# Altium PCB A313_4.PcbDoc (part 3 of 3)
Units mm, origin at the board's own origin, x right, y up, seen from the top; angles counter-clockwise.
Board outline 230 x 157 mm, 2 copper layers (Top Layer, Bottom Layer); 244 components, 187 nets, 1242 pads, 1093 vias.
Unrouted connection lines stored in the file: 1.
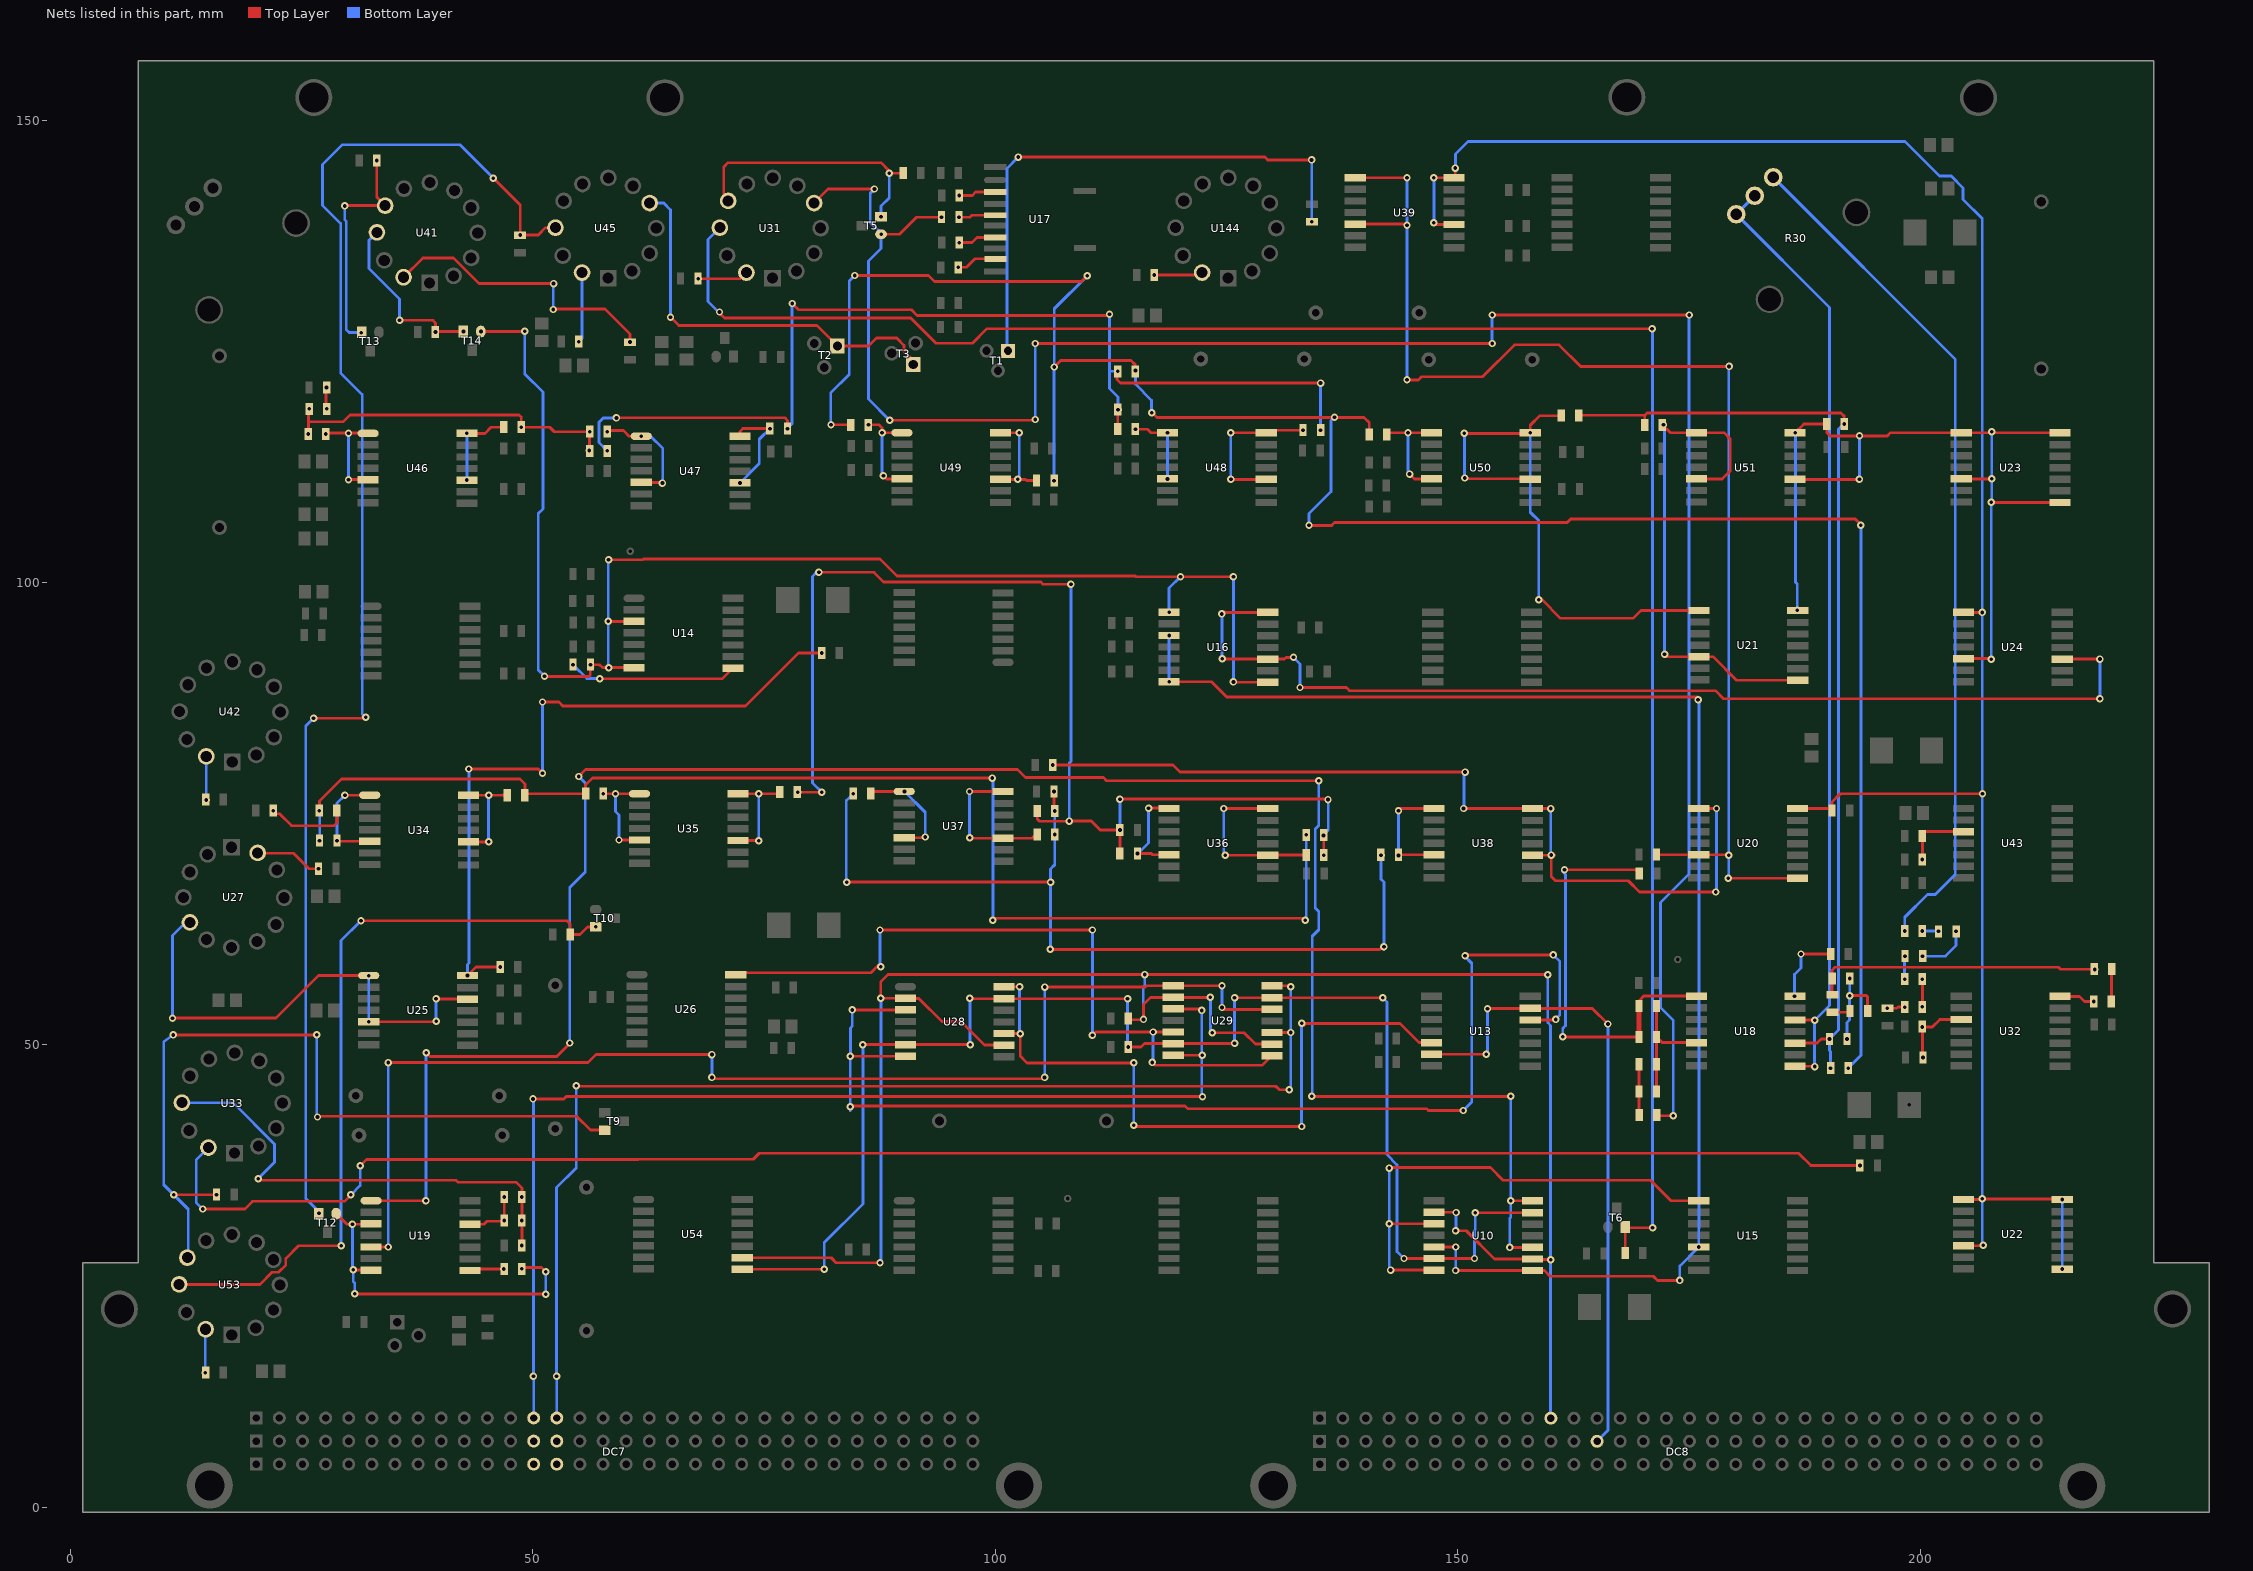
[diagram p3: the nets of this part, all layers, seen from the top]

## Via types
v1: diameter 0.8, hole 0.4, Top Layer to Bottom Layer, 1092 vias
v2: diameter 0.8, hole 0.4, Top Layer to Bottom Layer, tented top, 1 vias

## Nets (pads, with @x,y where several pads share a name; then routed paths per layer and width w, separated by ;. In a path a pad name is that pad's centre, name@x,y a point inside that pad or via, vN(x,y) a via of type N, cw(c..) or ccw(c..) an arc to the next point about the centre after c; other vN are vias at no path point) (continued)
NetR19_1: R19.1 T14.1 U14.3 U14.7 U16.1 U16.8 | length 156.6
  Top Layer w0.3: T14.1@44.357,127.142 v1@48.842,127.142 ; v1@51.25,89.825 56.05,89.825 56.199,89.974 56.199,90.508 R19.1@56.485,90.794 ; v1(56.224,91.107) 57.193,91.107 57.506,90.794 v1(58.2,90.794) U14.7@60.944,90.794 ; v1@58.125,95.775 v1(58.144,95.794) U14.3@60.944,95.794 ; v1(58.175,102.45) 61.85,102.45 61.95,102.55 87.525,102.55 89.375,100.7 115.15,100.7 115.225,100.625 v1(120.025,100.625) ; v1@120.025,100.7 120.1,100.7 120.175,100.625 v1(125.75,100.625) ; v1(125.75,89.25) 125.68,89.22 U16.8@129.467,89.22
  Bottom Layer w0.3: v1(49.1,127.175) 49.1,122.575 51.085,120.59 51.085,107.96 50.575,107.45 50.575,90.55 v1(51.25,89.875) ; v1(58.175,102.45) 58.144,102.419 v1(58.144,95.794) 58.144,90.85 v1(58.2,90.794) ; v2(118.793,96.77) 118.793,99.393 v1(120.025,100.625) ; v1(125.75,89.25) v1(125.75,100.625) v1@125.75,100.725
  other v1: 44.375,127.142
NetR19_2: R19.2 U14.8 | length 18.4
  Top Layer w0.3: v1@57.194,89.581 70.456,89.581 U14.8@71.619,90.744
  Bottom Layer w0.3: v1(54.324,91.107) 55.825,89.606 v1(57.219,89.606)
NetR21_1: R21.1 U17.8 | length 4.8
  Top Layer w0.3: R21.1@95.991,133.934 R21.1@96.139,134.082 ; v1(95.999,134.082) R21.1@96.139,134.082 ; U17.8@100.019,135.003 U17.8@99.936,135.003 ; U17.8@100.083,134.856 U17.8@99.936,135.003 ; R21.1@96.139,134.082 96.854,134.082 97.775,135.003 U17.8@99.936,135.003
NetR22_1: R22.1 U17.6 | length 4.2
  Top Layer w0.3: v1(96.099,136.757) 97.457,136.757 98.017,137.317 U17.6@99.991,137.317 ; U17.6@99.991,137.17 U17.6@100.055,137.17
NetR23_1: R23.1 U17.4 | length 4.7
  Top Layer w0.3: R23.1@95.991,139.014 95.991,139.241 R23.1@96.165,139.415 ; v1(96.074,139.507) 97.257,139.507 97.467,139.717 U17.4@99.908,139.717 ; U17.4@99.991,139.717 U17.4@99.908,139.717 ; U17.4@100.055,139.57 U17.4@99.908,139.717
NetR24_1: R24.1 U17.2 | length 4.5
  Top Layer w0.3: R24.1@95.991,141.554 95.991,141.891 R24.1@96.028,141.928 ; v1(96.099,141.857) 97.512,141.857 97.872,142.217 U17.2@99.991,142.217 ; U17.2@99.991,142.07 U17.2@100.055,142.07
NetR27_2: R27.2 U144.12 | length 5.1
  Top Layer w0.3: R27.2@117.326,133.243 122.083,133.243 U144.12@122.359,133.519
  other v1: 117.201,133.256
NetR28_1: R28.1 T1.1 | length 60.8
  Top Layer w0.3: v1(102.481,146.006) 129.15,146.006 129.456,145.7 v1(134.2,145.7)
  Bottom Layer w0.3: T1.1@101.255,124.657 101.255,144.78 v1(102.481,146.006) v1@102.675,146.2 ; v1@134.225,145.825 134.2,145.8 v1(134.2,145.7) 134.23,145.67 v1(134.23,139.007)
NetR30_1: R30.1 R293.2 | length 92.4
  Bottom Layer w0.3: R30.1@184.125,143.825 203.8,124.15 203.8,68.4 201.65,66.25 200.8,66.25 198.349,63.799 v1(198.349,62.307)
NetR30_2: R30.2 R30.3 U18.8 U18.12 | length 104.1
  Top Layer w0.3: U18.8@186.49,47.691 v1@188.334,47.691 ; U18.12@186.49,52.691 v1@188.559,52.691
  Bottom Layer w0.3: R30.2@182.125,141.825 R30.3@180.125,139.825 190.225,129.725 190.225,54.275 v1(188.6,52.65) v1(188.6,47.65) 188.6,47.425 v1@188.55,47.375
NetR32_1: R32.1 R33.1 U19.12 | length 6.1
  Top Layer w0.3: U19.12@43.171,30.593 44.7,30.593 45.032,30.925 46.815,30.925 v1(46.901,31.011) ; R33.1@46.901,31.399 v1(46.901,33.551)
NetR32_2: R32.2 R33.2 R35.1 U33.10 | length 51.6
  Top Layer w0.3: v1@20.25,35.565 20.465,35.35 41.682,35.35 41.881,35.15 48.175,35.15 48.801,34.524 v1(48.801,33.551) v1(48.801,31.011) 48.801,28.461 R35.1@48.625,28.285
  Bottom Layer w0.3: U33.10@12.035,43.746 17.554,43.746 22.05,39.25 22.05,37.3 v1(20.275,35.525)
  other v1: 48.774,28.307
NetR34_1: R34.1 T12.1 U19.3 U19.7 | length 39.7
  Top Layer w0.3: T12.1@28.716,31.744 29.867,30.593 v1(30.475,30.593) 32.183,30.593 32.364,30.775 U19.3@32.496,30.643 ; v1@30.557,25.643 U19.7@32.496,25.643 ; v1@30.756,23.044 v1(51.375,23.044) ; R34.1@48.774,25.907 50.918,25.907 v1@51.375,25.45
  Bottom Layer w0.3: v1(30.475,30.593) 30.475,26.031 v1@30.7,25.806 ; v1(30.557,25.662) 30.557,24.4 30.725,24.232 v1(30.725,23.094) ; v1(51.375,23.044) v1(51.375,25.469)
  other v1: 48.774,25.782
NetR34_2: R34.2 U19.8 | length 3.4
  Top Layer w0.3: U19.8@43.46,25.757 v1(46.849,25.757)
NetR36_1: R36.1 U18.14 | length 8.2
  Top Layer w0.3: v1(186.425,55.241) U18.14@186.49,55.241 ; v1(187.125,59.825) R36.1@190.357,59.825
  Bottom Layer w0.3: v1(186.425,55.241) 186.425,57.625 187.125,58.325 v1(187.125,59.825)
NetR39_1: R39.1 R40.2 U25.14 | length 75
  Top Layer w0.3: v1(42.917,57.495) 43.85,58.428 v1(46.466,58.428) ; v1(43.069,79.831) 50.569,79.831 v1(51.025,79.375) ; v1@50.988,79.337 v1@51.013,79.312 ; v1(51.025,87.075) 52.8,87.075 53.225,86.65 72.975,86.65 78.707,92.382 v1(81.229,92.382)
  Bottom Layer w0.3: v1(42.917,57.495) 42.917,58.7 43.069,58.852 v1(43.069,79.831) ; v1(51.025,79.375) v1(51.025,87.075)
NetR42_1: R42.1 U27.12 | length 7.5
  Top Layer w0.3: U27.12@20.245,71.255 20.775,70.725 24.1,70.725 25.782,69.043 v1(26.801,69.043)
NetR47_1: R47.1 T6.3 U31.10 | length 216.3
  Top Layer w0.3: v1(70.175,129.25) 70.175,129.125 70.25,129.05 70.7,128.6 90.85,128.6 93.575,125.875 97.525,125.875 99.1,127.45 v1(171.025,127.45) ; R47.1@168.126,27.418 168.13,27.422 T6.3@168.13,30.025 ; T6.3@168.13,30.295 T6.3@168.2,30.225 ; T6.3@168.4,30.025 T6.3@168.2,30.225 ; v1(171.075,30.225) T6.3@168.2,30.225
  Bottom Layer w0.3: v1(70.175,129.25) 70.05,129.25 68.925,130.375 68.925,137.082 U31.10@70.213,138.37 ; v1(171.025,127.45) 171.075,127.4 v1(171.075,30.225)
NetR48_1: R48.1 T5.3 U31.9 | length 29.2
  Top Layer w0.3: U31.9@71.102,141.266 70.625,141.743 70.625,144.95 71.075,145.4 87.625,145.4 88.525,144.5 v1(88.525,144.25) R48.1@89.997,144.25
  Top Layer w0.7: R48.1@89.997,144.25 R48.1@90.027,144.28
  Bottom Layer w0.3: v1(87.644,139.539) 87.644,140.702 88.525,141.583 v1(88.525,144.25)
NetR49_2: R49.2 U31.12 | length 5.5
  Top Layer w0.3: v1(67.875,132.843) 72.407,132.843 U31.12@73.083,133.519
NetR50_1: R50.1 R52.1 U32.3 | length 7.4
  Top Layer w0.3: R52.1@200.253,49.098 v1(200.253,51.925) 201.325,51.925 202.141,52.741 U32.3@204.454,52.741
  other v1: 200.324,48.633
NetR51_2: R51.2 U33.12 | length 191.3
  Top Layer w0.3: v1(14.275,32.25) 18.85,32.25 19.675,33.075 29.6,33.075 v1(30.3,33.775) ; v1@31.15,36.75 v1(31.313,36.913) 32.01,37.61 61.375,37.61 61.39,37.625 73.825,37.625 74.475,38.275 186.875,38.275 188.193,36.957 v1(193.499,36.957) ; R51.2@193.499,36.782 R51.2@193.599,36.782
  Bottom Layer w0.3: v1(14.275,32.25) 13.575,32.95 13.575,37.565 U33.12@14.905,38.895 ; v1(30.3,33.775) 31.313,34.788 v1(31.313,36.913)
NetR53_2: R53.2 R54.1 | length 9
  Top Layer w0.3: R53.2@21.801,74.993 22.607,74.993 23.9,73.7 28.5,73.7 28.799,73.999 R54.1@28.799,75.332
  other v1: 21.901,75.318
NetR54_2: R54.2 R55.2 R56.2 R57.2 R58.1 | length 139.6
  Top Layer w0.3: R54.2@26.908,75.641 26.908,76.358 29.3,78.75 48.6,78.75 49.128,78.222 49.128,76.843 49.45,77.165 R57.2@55.688,77.165 55.688,78.113 56.425,78.85 99.425,78.85 v1@99.625,78.65 ; v1(99.725,63.475) 99.725,63.675 99.75,63.7 v1@133.525,63.7
  Bottom Layer w0.3: v1@26.933,72.06 26.933,75.332 v1@26.933,75.4 ; v1(99.725,63.475) 99.75,63.5 v1@99.75,78.925 ; v1(133.525,63.475) 133.575,63.475 133.626,63.526 v1(133.626,72.718)
  other v1: 26.908,72.085 26.899,75.332 99.675,78.85
NetR55_1: R55.1 U34.1 U34.5 | length 12
  Top Layer w0.3: v1(28.808,72.085) 28.871,72.022 U34.5@32.496,72.022 ; v1@29.665,77.21 v1(29.665,76.993) 29.673,77.001 U34.1@32.35,77.001
  Bottom Layer w0.3: v1(28.808,72.085) 28.808,76.136 v1(29.665,76.993) ; v1@29.567,77.091 v1@29.676,77.199
NetR56_1: R56.1 U34.10 U34.14 | length 11.6
  Top Layer w0.3: U34.10@43.025,71.951 45.2,71.951 v1(45.201,71.95) ; U34.14@43.025,77.001 v1(45.201,77.001) 46.77,77.001 46.794,77.025 46.944,76.875 47.07,77.001 R56.1@47.228,76.843
  Bottom Layer w0.3: v1@45.201,71.981 v1(45.201,77.001)
NetR57_1: R57.1 U35.1 U35.5 | length 11.3
  Top Layer w0.3: v1(57.588,77.165) v1(58.925,77.165) U35.1@61.499,77.165 ; v1(59.299,72.149) U35.5@61.516,72.149
  Bottom Layer w0.3: v1(58.925,77.165) 58.925,75.225 59.299,74.851 v1(59.299,72.149)
NetR58_2: R58.2 R59.2 R60.2 R61.2 R62.2 R63.1 | length 125.6
  Top Layer w0.3: R59.2@78.592,77.351 v1(78.618,77.325) v1(81.225,77.325) ; v1(80.925,101.1) 86.875,101.1 87.925,100.05 104.925,100.05 105.175,99.8 v1(108.175,99.8) ; R63.1@104.527,75.285 104.527,74.448 104.79,74.185 v1@108,74.185 ; v1(108,74.2) 110.375,74.2 111.347,73.228 v1(113.473,73.228) R60.2@113.473,70.688 ; v1(113.473,76.575) v1@135.975,76.575 ; v1(135.526,70.518) R58.2@135.526,72.718
  Bottom Layer w0.3: v1@80.625,101.05 80.225,100.65 80.225,78.325 v1(81.225,77.325) ; v1(108,74.2) 108,80.475 108.175,80.65 v1(108.175,99.8) ; v1(113.473,73.228) v1(113.473,76.575) v1@113.473,76.777 ; v1(135.5,72.65) 135.5,72.728 136,73.228 v1@136,76.5
  other v1: 135.975,76.525
NetR59_1: R59.1 U35.10 U35.14 | length 11.3
  Top Layer w0.3: U35.10@72.19,72.099 v1@74.174,72.099 ; U35.14@72.19,77.149 v1(74.425,77.149) R59.1@76.49,77.149
  Bottom Layer w0.3: v1@74.425,72.1 v1(74.425,77.149)
  other v1: 74.4,72.075
NetR60_1: R60.1 U36.1 U36.5 | length 11.2
  Top Layer w0.3: v1(115.373,70.688) 116.9,70.688 117.027,70.561 U36.5@118.793,70.561 ; v1(116.575,75.6) 118.754,75.6 U36.1@118.793,75.561
  Bottom Layer w0.3: v1(115.373,70.688) 115.437,70.688 116.575,71.826 v1(116.575,75.6)
NetR61_1: R61.1 U36.10 U36.14 | length 18.4
  Top Layer w0.3: v1(124.711,75.561) U36.14@129.467,75.561 ; v1(124.85,70.511) U36.10@129.467,70.511 129.474,70.518 R61.1@133.626,70.518
  Bottom Layer w0.3: v1@124.711,70.65 v1(124.711,75.561)
NetR63_2: R63.2 R64.2 R65.2 R66.2 R67.1 | length 95.5
  Top Layer w0.3: v1(83.925,67.6) v1(105.975,67.6) ; v1@106.225,60.325 141.6,60.325 v1@142.025,60.75 ; R63.2@106.349,75.053 v1(106.349,77.407)
  Bottom Layer w0.3: v1(83.925,67.6) 83.89,67.635 83.89,76.411 v1(84.644,77.165) ; v1@105.975,60.575 v1(105.975,67.6) 105.975,69.026 106.427,69.478 v1(106.427,72.745) v1(106.427,75.285) ; v1(141.714,70.518) 141.714,67.911 142.025,67.6 v1(142.025,60.6) v1@142.025,60.325
  other v1: 105.95,60.325
NetR64_1: R64.1 U37.1 U37.5 | length 11.6
  Top Layer w0.3: R64.1@86.782,77.403 U37.1@90.154,77.403 v1(90.18,77.403) ; U37.5@90.154,72.403 92.353,72.403 v1(92.425,72.475)
  Bottom Layer w0.3: v1(90.18,77.403) 92.425,75.158 v1(92.425,72.475)
NetR65_1: R65.1 U37.10 U37.14 | length 15.8
  Top Layer w0.3: v1@97.172,72.353 U37.10@100.829,72.353 103.952,72.353 R65.1@104.251,72.652 ; v1(97.203,77.403) U37.14@100.829,77.403
  Bottom Layer w0.3: v1(97.203,77.403) 97.203,72.422 v1(97.225,72.4)
NetR66_1: R66.1 U38.1 U38.5 | length 16.6
  Top Layer w0.3: v1@143.436,75.561 U38.1@147.431,75.561 ; R66.1@143.44,70.561 U38.5@147.431,70.561 147.427,70.557 R66.1@143.599,70.557
  Bottom Layer w0.3: v1@143.599,70.557 v1(143.6,75.325)
  other v1: 143.6,70.475
NetR68_1: R68.1 U20.1 U38.10 U38.14 | length 97.2
  Top Layer w0.3: v1(106.199,80.257) 119.2,80.257 119.957,79.5 v1(150.8,79.5) ; v1(150.639,75.561) U38.14@158.106,75.561 v1@160.075,75.561 ; v1@150.675,79.475 150.801,79.496 150.825,79.5 v1@150.875,79.45 ; U38.10@158.106,70.511 v1@160.125,70.511 ; v1(160.125,70.525) v1@160.125,70.511 ; v1@160.475,70.511 v1@160.125,70.511 ; U20.1@176.07,75.561 v1(177.989,75.561) ; v1(177.9,66.525) 169.675,66.525 168.45,67.75 160.575,67.75 160.125,68.2 v1@160.125,70.511
  Bottom Layer w0.3: v1@150.675,75.65 v1@150.675,79.475 ; v1@160.075,70.736 v1(160.075,75.55) ; v1(177.989,75.561) 177.989,66.736 v1@178.075,66.65
NetR69_1: R69.1 U20.5 U20.8 U39.1 U39.5 | length 140.8
  Top Layer w0.3: U39.5@138.922,138.76 v1@144.384,138.76 ; U39.1@138.922,143.76 v1@144.516,143.76 ; v1@144.525,121.9 145.759,121.9 146.109,122.25 152.675,122.25 156.125,125.7 160.975,125.7 163.306,123.369 v1(179.35,123.369) ; R69.1@171.507,70.561 U20.5@176.07,70.561 v1@179.325,70.561 ; v1@179.275,68.011 U20.8@186.744,68.011
  Bottom Layer w0.3: v1(144.525,121.919) v1(144.525,138.619) v1@144.525,143.75 ; v1@179.325,68.08 v1(179.325,70.5) v1@179.325,123.35
  other v1: 179.275,68.03 144.525,143.769
NetR70_1: R70.1 U20.14 U22.1 U22.5 U22.8 U22.14 U24.1 U39.10 U39.14 | length 228.9
  Top Layer w0.3: v1@147.235,138.71 U39.10@149.597,138.71 ; v1(147.425,143.76) U39.14@149.597,143.76 ; U39.14@149.747,143.76 149.747,144.664 v1(149.751,144.818) ; U20.14@186.744,75.561 R70.1@190.242,75.561 ; R70.1@190.484,75.319 190.484,76.259 191.375,77.15 v1@206.775,77.15 ; U22.5@204.708,28.27 v1@206.58,28.27 ; U22.1@204.708,33.27 206.67,33.27 v1@206.743,33.343 ; U24.1@204.708,96.77 206.745,96.77 v1@206.75,96.775 ; v1(206.726,33.343) v1@206.743,33.343 ; v1@206.75,33.35 v1@206.743,33.343 ; U22.8@215.13,25.72 U22.8@215.383,25.72 ; U22.14@215.383,33.27 215.31,33.343 v1@206.743,33.343
  Bottom Layer w0.3: v1@147.211,138.703 v1(147.425,138.917) v1(147.425,143.76) ; v1@149.775,144.45 149.775,146.325 151.135,147.685 198.39,147.685 202.125,143.95 203.375,143.95 204.65,142.675 204.65,141.425 206.726,139.349 v1(206.726,33.343) 206.726,28.424 v1(206.825,28.325) ; v1(215.375,25.75) v1(215.375,33.266)
  other v1: 206.751,77.143 206.721,96.763
NetR71_1: R71.1 T14.3 U41.10 | length 19.3
  Top Layer w0.3: v1(35.575,128.35) 39.175,128.35 39.449,128.076 v1(39.449,127.082) 39.509,127.142 v1(42.477,127.142)
  Bottom Layer w0.3: U41.10@33.129,137.862 32.275,137.008 32.275,133.95 35.575,130.65 v1(35.575,128.35)
NetR72_1: R72.1 T13.3 U41.9 | length 24.9
  Top Layer w0.3: v1(29.651,140.724) 29.685,140.758 U41.9@34.018,140.758 33.099,141.677 R72.1@33.099,145.507 ; v1(31.417,127.025) T13.3@31.461,127.069
  Bottom Layer w0.3: v1@29.525,140.85 v1(29.651,140.724) 29.651,139.222 29.8,139.074 29.8,127.35 30.125,127.025 v1(31.417,127.025)
  other v1: 33.099,145.632
NetR73_1: R73.1 U41.12 | length 31.4
  Top Layer w0.3: U41.12@35.999,133.011 38.088,135.1 41.4,135.1 41.964,134.536 44.174,132.325 v1(52.225,132.325) ; v1@52.2,129.575 57.775,129.575 60.493,126.857 v1(60.493,125.999)
  Bottom Layer w0.3: v1(52.2,129.525) 52.2,132.225 v1@52.3,132.325
NetR74_1: R74.1 R75.1 U43.3 | length 6.9
  Top Layer w0.3: v1(200.253,70.053) R74.1@200.253,72.593 ; R74.1@200.3,73.061 U43.3@204.708,73.061
NetR76_2: R76.2 U42.12 | length 4.8
  Bottom Layer w0.3: v1@14.424,76.532 14.663,76.771 U42.12@14.663,81.195
  other v1: 14.675,76.475
NetR77_1: R77.1 T12.3 U45.10 | length 153.8
  Top Layer w0.3: v1(26.275,85.325) 31.45,85.325 v1@31.525,85.4 ; v1(45.7,143.725) 48.618,140.807 v1(48.618,137.574) 50.574,137.574 51.37,138.37 U45.10@52.433,138.37
  Bottom Layer w0.3: v1(26.275,85.325) 25.425,84.475 25.425,33.375 26.85,31.95 v1(26.85,31.8) ; v1(31.9,85.425) 31.525,85.8 31.525,120.35 29.2,122.675 29.2,138.825 27.25,140.775 27.25,145.2 29.4,147.35 42.075,147.35 v1(45.7,143.725)
NetR79_1: R79.1 U45.12 | length 7.6
  Bottom Layer w0.3: v1(54.95,126.051) 55.303,126.404 U45.12@55.303,133.519
NetR80_2: R80.2 R81.1 | length 2.5
  Top Layer w0.3: R81.1@27.621,118.567 R80.2@27.621,121.093
  other v1: 27.699,118.782 27.676,121.093
NetR81_2: R81.2 R82.2 R83.2 R84.2 R85.1 | length 36.6
  Top Layer w0.3: R82.2@25.721,116.154 25.721,117.375 ; R81.2@25.721,118.567 25.721,117.375 ; v1(56.099,114.27) R84.2@56.099,116.307 ; v1(56.124,116.307) R84.2@56.099,116.307 ; 25.721,117.375 29.475,117.375 30.225,118.125 48.5,118.125 48.726,117.899 v1(48.726,116.793) 51.814,116.793 52.3,116.307 R84.2@56.099,116.307
  other v1: 25.699,116.057 25.799,118.782
NetR82_1: R82.1 U46.1 U46.5 | length 11.8
  Top Layer w0.3: R82.1@27.621,116.154 v1(30.05,116.154) 32.162,116.154 U46.1@32.242,116.074 ; v1(30.05,111.126) U46.5@32.175,111.126
  Bottom Layer w0.3: v1(30.05,111.126) v1(30.05,116.154)
  other v1: 27.599,116.057
NetR83_1: R83.1 U46.10 U46.14 | length 9.3
  Top Layer w0.3: v1(42.85,116.126) 44.808,116.126 45.475,116.793 R83.1@46.826,116.793
  Bottom Layer w0.3: v1(42.85,111.076) v1(42.85,116.126)
NetR84_1: R84.1 U47.1 U47.5 | length 12.8
  Top Layer w0.3: R84.1@57.999,116.432 58.026,116.432 59.768,116.432 60.38,115.82 v1(61.706,115.82) ; U47.5@61.706,110.82 v1@64.025,110.82
  Bottom Layer w0.3: v1(61.706,115.82) 62.73,115.82 64.025,114.525 v1@64.025,110.825
  other v1: 64,110.75 58.026,116.307
NetR85_2: R85.2 R86.2 R87.2 R88.2 R89.2 R90.1 | length 115.5
  Top Layer w0.3: v1(59.025,117.8) 59.05,117.825 77.225,117.825 77.526,117.524 v1(77.526,116.643) ; v1(78.025,130.175) 78.7,129.5 90.924,129.5 91.549,128.875 112.2,128.875 v1(112.35,129.025) ; R90.1@113.151,122.668 113.151,121.967 113.55,121.568 v1(135.175,121.568) ; R87.2@113.249,116.582 R89.2@113.249,118.675
  Bottom Layer w0.3: v1(58.026,114.243) 57.125,115.144 57.125,117.325 57.6,117.8 v1(59.025,117.8) ; v1(77.526,116.643) 78.025,117.142 v1(78.025,130.175) ; v1(112.35,129.025) 112.35,122.908 ; v1(113.226,122.843) 112.415,122.843 112.35,122.908 ; v1(113.275,118.675) 113.275,120.05 112.35,120.975 112.35,122.908 ; v1(135.175,121.568) 135.175,116.469 v1(135.176,116.468)
NetR86_1: R86.1 U47.10 U47.14 | length 11.1
  Top Layer w0.3: U47.14@72.381,115.82 72.381,116.331 72.693,116.643 v1(75.626,116.643)
  Bottom Layer w0.3: v1(72.381,110.77) 74.475,112.864 74.475,115.492 v1(75.626,116.643)
NetR87_1: R87.1 U48.1 U48.5 | length 8.6
  Top Layer w0.3: v1(115.149,116.582) 116.425,116.582 116.806,116.201 v1(118.625,116.201)
  Bottom Layer w0.3: v1(118.625,111.201) v1(118.625,116.201)
NetR88_1: R88.1 U48.10 U48.14 | length 16.4
  Top Layer w0.3: v1@125.451,116.201 U48.14@129.3,116.201 ; v1(125.476,111.151) U48.10@129.3,111.151 ; U48.14@129.567,116.468 v1(133.276,116.468)
  Bottom Layer w0.3: v1@125.452,111.175 v1(125.452,116.2)
NetR90_2: R90.2 R91.2 R92.2 R93.2 R94.1 | length 242.5
  Top Layer w0.3: v1(82.225,117.057) R91.2@84.374,117.057 ; v1(84.8,133.2) 92.784,133.2 93.421,132.563 109.338,132.563 v1(109.95,133.175) ; v1(106.375,123.3) 107.075,124 114.675,124 115.126,123.549 R90.2@115.126,122.843 ; v1(116.9,118.35) 117,118.35 117.5,117.85 139.875,117.85 140.446,117.279 R93.2@140.446,116.027 ; v1(133.925,106.175) 136.375,106.175 136.7,106.5 161.85,106.5 162.225,106.875 193,106.875 193.65,106.225 v1@193.65,105.95 ; R94.1@192.199,47.882 192.225,47.856 v1(192.225,47.475)
  Bottom Layer w0.3: v1(82.225,117.057) 82.19,117.092 82.19,120.49 84.2,122.5 84.2,132.6 v1(84.8,133.2) ; v1(106.351,111.018) 106.351,123.226 v1@106.425,123.3 ; v1(106.375,123.3) 106.375,129.6 v1(109.95,133.175) ; v1(115.149,122.925) 115.149,121.451 116.9,119.7 v1(116.9,118.35) ; v1@133.925,105.975 v1(133.925,106.175) 133.925,107.45 136.3,109.825 136.3,117.5 v1(136.675,117.875) ; v1(192.225,47.475) 193.625,48.875 193.625,106.175 v1(193.6,106.2)
NetR91_1: R91.1 U49.1 U49.5 | length 10.9
  Top Layer w0.3: v1(86.274,117.057) 87.418,117.057 87.75,116.725 v1(87.75,116.201) U49.1@89.9,116.201 ; v1(87.9,111.55) 88.249,111.201 U49.5@89.9,111.201
  Bottom Layer w0.3: v1@87.75,111.7 v1(87.75,116.201)
NetR92_1: R92.1 U49.10 U49.14 | length 10.8
  Top Layer w0.3: U49.10@100.575,111.151 v1(102.425,111.151) 103.225,111.151 103.358,111.018 R92.1@104.451,111.018 ; U49.14@100.575,116.201 v1(102.576,116.201)
  Bottom Layer w0.3: v1@102.576,111.302 v1(102.576,116.201)
NetR93_1: R93.1 U50.1 U50.5 | length 12
  Top Layer w0.3: R93.1@142.52,116.201 v1(144.625,116.201) U50.1@147.177,116.201 ; v1(144.8,111.725) 145.324,111.201 U50.5@147.177,111.201 U50.5@147.028,111.35
  Bottom Layer w0.3: v1(144.625,116.201) 144.625,111.9 v1(144.8,111.725)
NetR94_2: R94.2 R95.2 R96.2 R97.2 R285.2 U18.10 | length 105.1
  Top Layer w0.3: R95.2@163.101,118.093 170.275,118.093 ; R96.2@170.242,117.043 170.242,118.06 170.275,118.093 ; U18.10@186.49,50.191 188.875,50.191 189.316,50.632 v1(190.208,50.632) ; v1(191.801,117.143) 191.801,117.974 191.45,118.325 170.507,118.325 170.275,118.093
  Bottom Layer w0.3: v1(190.325,47.475) 190.325,49.275 190.208,49.392 v1(190.208,50.632) 191.175,51.599 191.175,116.6 v1@191.76,117.185
NetR95_1: R95.1 U21.1 U50.10 U50.14 | length 60.6
  Top Layer w0.3: v1(150.725,116.125) 157.776,116.125 v1(157.852,116.201) 157.852,117.002 158.893,118.043 R95.1@161.151,118.043 ; v1@150.75,111.226 U50.10@157.877,111.226 ; v1(158.775,98.15) 159.1,98.15 161.125,96.125 168.975,96.125 169.826,96.976 U21.1@176.1,96.976 ; R95.1@161.201,118.043 R95.1@161.151,118.043 ; R95.1@161.201,118.093 R95.1@161.151,118.043
  Bottom Layer w0.3: v1@150.725,111.55 v1(150.725,116.125) ; v1@157.852,116.302 v1(157.852,116.201) 157.852,107.598 158.775,106.675 v1(158.775,98.15)
  other v1: 150.775,111.3
NetR96_1: R96.1 U21.5 U21.8 U51.1 U51.5 | length 56
  Top Layer w0.3: R96.1@172.142,117.043 172.984,116.201 U51.1@175.816,116.201 178.799,116.201 179.475,115.525 179.475,112.076 178.6,111.201 U51.5@175.816,111.201 ; v1@172.2,92.125 172.349,91.976 U21.5@176.1,91.976 177.599,91.976 180.149,89.426 U21.8@186.775,89.426
  Bottom Layer w0.3: v1(172.25,117.075) 172.375,116.95 v1(172.375,92.225)
NetR97_1: R97.1 U21.14 U23.1 U23.5 U23.8 U23.14 U24.5 U51.10 U51.14 | length 99.6
  Top Layer w0.3: U51.10@186.49,111.151 v1(193.449,111.151) ; v1(186.49,116.201) 187.432,117.143 R97.1@189.901,117.143 189.901,116.249 190.293,115.857 v1(193.45,115.857) 196.456,115.857 196.8,116.201 U23.1@204.454,116.201 U23.14@215.129,116.201 ; U23.5@204.454,111.201 v1@207.699,111.201 ; U24.5@204.708,91.77 207.63,91.77 v1(207.7,91.7) ; v1@207.626,108.651 U23.8@215.129,108.651
  Bottom Layer w0.3: v1@186.525,116.201 186.525,100.025 186.725,99.825 v1(186.725,97) ; v1(193.449,111.151) v1(193.45,115.857) ; v1(207.7,91.7) 207.695,91.705 v1(207.695,108.682) 207.75,108.737 v1(207.75,116.3)
  other v1: 207.769,111.231
NetR98_1: R98.1 T10.3 U53.10 | length 82.8
  Top Layer w0.3: U53.10@11.735,24.096 20.471,24.096 21.788,25.413 22.48,25.413 23.27,26.204 23.27,26.895 24.65,28.275 v1(29.25,28.275) ; v1(31.4,63.425) 53.682,63.425 54.032,63.075 R98.1@54.032,61.925 55.075,61.925 55.9,62.75 56.492,62.75 T10.3@56.756,62.486
  Bottom Layer w0.3: v1(29.25,28.275) 29.25,61.275 v1(31.4,63.425)
  other v1: 56.781,62.761
NetR99_1: R99.1 T9.3 U53.9 | length 87.2
  Top Layer w0.3: v1@10.975,33.793 v1(11.15,33.793) v1(15.776,33.793) ; v1(11.1,51.075) 26.55,51.075 26.3,51.1 v1(26.625,51.1) ; v1(26.7,42.2) 26.775,42.275 54.725,42.275 56.216,40.784 T9.3@57.769,40.784
  Bottom Layer w0.3: v1(11.1,51.075) 10.075,50.325 10.075,34.868 v1(11.15,33.793) 12.725,32.218 12.725,27.093 U53.9@12.624,26.992 ; v1(26.625,51.1) 26.625,42.275 v1(26.7,42.2)
NetR100_2: R100.2 U53.12 | length 4.7
  Bottom Layer w0.3: v1@14.563,14.421 U53.12@14.563,19.119
  other v1: 14.563,14.525
NetR284_1: R284.1 R294.2 | length 2.2
  Bottom Layer w0.3: v1@198.326,57.126 v1@198.326,59.368
  other v1: 198.353,57.099 198.376,59.593
NetR284_2: R284.2 R302.1 | length 5.6
  Bottom Layer w0.3: v1(200.276,59.593) 202.743,59.593 203.899,60.749 v1(203.899,62.282)
NetR285_1: R285.1 R297.2 R298.2 | length 10.2
  Top Layer w0.3: v1(192.384,55.325) 194.2,55.325 194.326,55.199 R297.2@194.326,53.686
  Bottom Layer w0.3: v1(192.108,50.632) 192.108,52.424 192.384,52.7 v1(192.384,55.325) 192.401,55.342 v1(192.401,57.168)
NetR286_1: R286.1 R287.1 R292.2 | length 5.9
  Top Layer w0.3: R292.2@169.607,41.986 R286.1@169.607,44.944 R287.1@169.607,47.902
NetR286_2: R286.2 R287.2 R288.1 R289.1 U18.5 | length 13.8
  Top Layer w0.3: R286.2@171.507,44.944 R289.1@171.507,50.861 ; R288.1@171.507,54.178 R289.1@171.507,50.861 ; U18.5@175.816,50.241 172.126,50.241 R289.1@171.507,50.861
NetR288_2: R288.2 R289.2 R290.1 U18.1 | length 44.9
  Top Layer w0.3: v1@161.375,50.861 R289.2@169.607,50.861 ; v1(161.55,68.925) 169.219,68.925 R290.1@169.626,68.518 ; R288.2@169.607,54.178 169.607,54.757 170.128,55.278 175.779,55.278 U18.1@175.816,55.241
  Top Layer w0.5: R289.2@169.607,50.861 R288.2@169.607,54.178
  Bottom Layer w0.3: v1@161.325,68.75 161.65,68.425 161.65,52.075 161.375,51.8 v1(161.375,50.875)
NetR291_1: R291.1 R294.1 | length 2.7
  Top Layer w0.3: R291.1@200.253,54.432 v1(200.253,57.099)
  other v1: 200.249,54.107
NetR291_2: R291.2 R300.1 | length 2.2
  Top Layer w0.3: R300.1@196.626,54.107 v1(196.468,53.949) 197.467,53.949 197.625,54.107 R291.2@198.349,54.107
  other v1: 198.35,54.05
NetR293_1: R293.1 R302.2 | length 1.8
  Bottom Layer w0.3: v1(200.249,62.307) 201.974,62.307 v1(201.999,62.282)
NetR295_1: R295.1 U32.14 | length 3.9
  Top Layer w0.3: U32.14@215.129,55.241 217.234,55.241 217.782,54.693 v1(218.801,54.693)
NetR295_2: R295.2 R296.1 | length 2.9
  Top Layer w0.3: R295.2@220.705,55.253 R296.1@220.705,58.138
NetR296_2: R296.2 R298.1 R301.1 | length 31.2
  Top Layer w0.3: R301.1@190.484,55.424 190.484,58.059 190.825,58.4 214.95,58.4 215.168,58.182 R296.2@218.849,58.182
  other v1: 218.9,58.15
NetR297_1: R297.1 R301.2 | length 1.9
  Top Layer w0.3: R301.2@190.546,53.524 R297.1@192.432,53.524
NetT2_1: T2.1 T3.1 U45.5 | length 43.9
  Top Layer w0.3: v1(64.875,128.7) 65.775,127.8 80.7,127.8 T2.1@82.925,125.575 86.275,125.575 87.14,126.44 89.342,126.44 90.132,125.65 90.132,124.975 91.12,123.987 T3.1@91.12,123.574
  Bottom Layer w0.3: U45.5@62.618,141.037 64.138,141.037 64.875,140.3 v1(64.875,128.7)
NetU10_3: U10.3 U10.7 U15.1 | length 55.1
  Top Layer w0.3: v1(142.743,25.643) U10.7@147.431,25.643 ; v1@142.818,30.643 U10.3@147.431,30.643 ; v1@142.85,36.75 142.875,36.725 153.55,36.725 154.925,35.35 170.875,35.35 173.082,33.143 U15.1@176.07,33.143
  Bottom Layer w0.3: v1(142.6,36.675) 142.6,25.787 v1(142.743,25.643)
  other v1: 142.6,30.65
NetU10_5: U10.5 U10.8 U15.5 U16.3 U16.7 | length 156.1
  Top Layer w0.3: v1(118.793,89.27) 123.38,89.27 125.025,87.625 v1@175.975,87.625 ; U10.5@147.431,28.143 v1(149.793,28.143) ; v1@149.775,25.593 U10.8@158.106,25.593 159.382,25.593 160,24.975 171.15,24.975 171.6,24.525 v1(174.025,24.525)
  Bottom Layer w0.3: v1(118.793,89.27) v1(118.793,94.27) ; v1@149.793,25.618 v1(149.793,28.143) ; v1(174.025,24.525) 174.025,26.099 v1(176.07,28.143) 176.07,30.106 176.1,30.136 v1@176.1,87.325
  other v1: 149.775,25.6 176,87.325
NetU10_10: U10.10 U10.14 U19.1 | length 225.8
  Top Layer w0.3: U19.1@32.496,33.143 v1@38.368,33.143 ; v1(38.45,49.15) 38.85,48.75 52.575,48.75 v1@54.05,50.225 ; v1(54.95,79.025) 55.7,79.775 102.4,79.775 103.275,78.9 111.7,78.9 112.05,78.55 v1(134.975,78.55) ; v1(134.225,44.425) v1(155.75,44.425) ; v1(155.625,28.093) U10.10@158.106,28.093 ; v1@155.75,33.143 U10.14@158.106,33.143
  Bottom Layer w0.3: v1(38.425,33.125) v1@38.425,48.925 ; v1(53.975,50.2) 53.975,67 55.65,68.675 55.65,78.325 v1(54.95,79.025) ; 134.275,44.825 134.275,61.75 134.975,62.45 134.975,64.425 134.6,64.8 134.6,73.325 134.975,73.7 v1(134.975,78.55) ; v1(155.625,28.093) 155.625,31.225 155.75,31.35 v1(155.75,33.125) v1(155.75,44.425)
NetU13_5: U13.5 U28.10 U28.14 | length 74.6
  Top Layer w0.3: U28.10@100.95,51.226 v1@102.474,51.226 ; U28.14@100.95,56.276 v1(102.624,56.276) ; v1(102.7,51.2) 102.7,48.775 103.425,48.05 v1(114.975,48.05) ; v1(114.975,41.3) 115.1,41.175 v1(133.125,41.175) ; v1(133.125,52.35) 133.375,52.1 133.575,52.3 143.75,52.3 145.809,50.241 U13.5@147.177,50.241
  Bottom Layer w0.3: v1@102.624,51.276 v1(102.624,56.276) ; v1@114.95,41.1 114.975,41.125 v1(114.975,41.3) v1(114.975,48.05) ; v1(133.125,41.175) v1(133.125,52.35)
NetU13_12: U13.12 U28.3 U28.7 | length 127.4
  Top Layer w0.3: v1@84.101,48.776 v1(84.3,48.776) U28.7@90.275,48.776 ; v1(84.325,43.3) 84.425,43.4 120.5,43.4 120.8,43.1 146.625,43.1 146.825,42.9 v1(150.6,42.9) ; v1(84.525,53.776) U28.3@90.275,53.776 ; v1(150.8,59.65) 150.875,59.725 v1(160.325,59.725) ; U13.12@157.85,52.691 160.689,52.691 160.689,52.7 v1@160.225,52.7
  Bottom Layer w0.3: 84.3,42.9 v1(84.3,48.776) ; v1@84.325,48.801 84.325,51.825 84.525,52.025 v1(84.525,53.776) ; v1(150.6,42.9) 151.525,43.825 151.525,58.825 150.7,59.65 v1(150.8,59.65) ; v1(160.325,59.725) 161.05,59 161.05,53.25 160.55,52.75 v1@160.55,52.7
  other v1: 160.6,52.75
NetU16_10: U16.10 U16.14 U24.10 | length 116.6
  Top Layer w0.3: v1@124.75,91.65 124.82,91.72 124.826,91.715 129.462,91.715 U16.10@129.467,91.72 131.275,91.72 131.455,91.9 v1(132.25,91.9) ; v1@124.775,96.825 124.83,96.77 U16.14@129.467,96.77 ; v1@132.25,91.72 v1@132.345,91.72 ; v1(132.95,88.65) 137.95,88.65 138.3,88.3 177.9,88.3 178.78,87.42 v1(219.455,87.42) ; U24.10@215.383,91.72 v1(219.455,91.72)
  Bottom Layer w0.3: v1@124.5,91.8 v1(124.5,96.6) v1@124.5,96.9 ; v1(132.25,91.9) 132.95,91.2 v1(132.95,88.65) ; v1(219.455,91.72) v1(219.455,87.42) v1@219.6,87.275
  other v1: 124.55,91.75
NetU19_5: U19.5 U29.1 U29.12 | length 132.1
  Top Layer w0.3: U19.5@32.496,28.143 v1(34.343,28.143) ; v1(34.343,48.082) 55.957,48.082 56.825,48.95 v1(69.35,48.95) ; v1(69.35,46.475) 69.485,46.34 105.19,46.34 v1(105.325,46.475) ; v1(105.35,56.25) 116.241,56.25 116.375,56.384 U29.1@119.237,56.384 v1(124.509,56.384) ; v1@124.709,53.834 U29.12@129.912,53.834
  Bottom Layer w0.3: v1(34.343,28.143) v1(34.343,48.082) ; v1@69.35,46.7 v1(69.35,48.95) ; v1(105.325,46.475) 105.35,46.475 v1(105.35,56.25) ; v1(124.509,54.034) v1(124.509,56.384)
NetU25_1: U25.1 U25.5 U25.12 U27.5 | length 52.9
  Top Layer w0.3: v1@10.95,52.675 v1@11.091,52.816 ; v1(11.016,52.891) 22.191,52.891 26.795,57.495 U25.1@32.242,57.495 v1(32.25,57.488) ; v1(32.242,52.495) 39.483,52.495 v1(39.544,52.556) ; v1@39.519,54.946 U25.12@42.917,54.946
  Bottom Layer w0.3: v1(11.016,52.891) 11.016,61.823 12.43,63.237 U27.5@12.905,63.237 ; v1(32.242,52.495) 32.25,52.503 v1(32.25,57.488) ; v1@39.475,52.525 39.519,52.569 v1(39.519,54.977)
NetU26_14: U26.14 U29.5 U29.8 | length 79.6
  Top Layer w0.3: U26.14@71.936,57.622 72.114,57.8 86.55,57.8 87.325,58.575 87.5,58.575 v1(87.625,58.45) ; v1(87.525,62.425) v1(110.5,62.425) ; v1(110.5,51.05) 110.834,51.384 v1(117.059,51.384) U29.5@119.237,51.384 ; v1(116.975,48.1) 117.275,47.8 128.878,47.8 U29.8@129.912,48.834
  Bottom Layer w0.3: v1@87.525,58.825 v1(87.525,62.425) ; v1(110.5,51.05) v1(110.5,62.425) ; v1@117.059,48.184 v1(117.059,51.384)
"OC\"A\"": DC7.A13 DC7.B13 DC7.C13 U29.3 U29.7 | length 122.8
  Top Layer w0.3: v1(50,44.15) 53.35,44.15 53.6,44.4 v1(122.4,44.4) ; U29.7@119.237,48.884 v1(122.375,48.884) ; U29.3@119.237,53.884 v1@122.166,53.884
  Bottom Layer w0.3: v1@50.05,44.15 v1(50.05,14.175) 50.075,14.15 DC7.C13@50.075,9.65 ; v1(122.325,53.725) 122.325,53.862 122.334,53.862 v1@122.334,44.275
"OC\"B\"": DC7.A14 DC7.B14 DC7.C14 U29.10 U29.14 | length 129
  Top Layer w0.3: v1(54.675,45.575) 54.875,45.525 130.325,45.525 130.7,45.15 v1(131.775,45.15) ; U29.10@129.912,51.334 v1(131.941,51.334) ; U29.14@129.912,56.384 v1@131.847,56.384
  Bottom Layer w0.3: DC7.C14@52.575,9.65 52.575,14.125 v1(52.55,14.15) 52.55,34.575 54.675,36.7 v1@54.675,45.4 ; v1@131.941,45.15 v1(131.941,51.334) v1(131.941,56.291)
PP: DC8.C11 R107.2 U10.2 U10.9 U28.2 U28.9 U29.2 U29.9 U54.9 | length 223.8
  Top Layer w0.3: U54.9@72.635,26.97 82.255,26.97 82.8,26.425 v1(87.525,26.425) ; U28.2@89.847,55.05 v1(87.625,55.05) 87.6,55.05 87.6,56.8 88.4,57.6 v1(116.15,57.6) ; U28.2@90.275,55.026 91.724,55.026 94.225,52.525 96.275,52.525 98.824,49.976 U28.9@100.95,49.976 ; R107.2@114.431,52.706 116.025,52.706 v1(116.025,52.75) 116.025,54.375 116.784,55.134 U29.2@119.237,55.134 v1(123.241,55.134) ; v1@116.15,57.4 v1(116.15,57.6) ; v1(123.45,51.3) 126.925,51.3 128.141,50.084 U29.9@129.912,50.084 ; U10.2@147.431,31.893 v1@149.782,31.893 ; v1(149.775,29.9) 150.925,29.9 153.982,26.843 U10.9@158.106,26.843 158.174,26.775 v1(160.05,26.775) ; v1@159.725,57.6 v1(116.15,57.6)
  Bottom Layer w0.3: v1@87.625,26.425 v1(87.625,55.05) ; v1@116,52.75 116,56.225 116.15,56.375 v1(116.15,57.6) ; v1(123.241,55.134) 123.275,55.1 123.275,51.475 v1(123.45,51.3) ; v1@149.825,29.9 v1(149.825,31.875) ; v1@159.925,57.6 159.75,57.425 159.75,52.398 160.05,52.098 v1(160.05,26.775) DC8.C11@160.05,9.625
  other v1: 159.725,57.575
PP_: R103.1 U10.6 U10.13 U28.6 U28.13 U29.6 U29.13 U54.8 | length 154
  Top Layer w0.3: U54.8@72.635,25.72 v1(81.505,25.72) ; v1(85.675,50.026) U28.6@90.275,50.026 v1(97.301,50.026) ; v1@97.524,54.976 U28.13@100.95,54.976 v1(114.301,54.976) ; R103.1@114.23,49.606 R103.1@114.23,49.757 ; v1(114.374,49.757) 115.748,49.757 116.125,50.134 U29.6@119.237,50.134 v1@125.716,50.134 ; v1@125.891,55.084 U29.13@129.912,55.084 v1(141.9,55.084) ; v1(144.193,26.893) U10.6@147.431,26.893 v1(151.818,26.893) ; v1(151.893,31.843) U10.13@158.106,31.843
  Bottom Layer w0.3: v1(81.505,25.72) 81.505,28.63 85.675,32.8 v1(85.675,50.026) ; v1@97.25,50.078 v1(97.25,55.025) ; v1@114.301,49.757 v1(114.301,54.976) ; v1(125.875,50.175) v1(125.875,55.1) ; v1(141.9,55.084) 142.35,54.634 142.35,38.127 143.45,37.027 143.45,27.637 v1(144.193,26.893) ; v1(151.818,26.893) 151.818,29.925 151.893,30 v1(151.893,31.843)
"upr vih": DC8.B13 U13.6 U13.13 | length 70.1
  Top Layer w0.3: U13.6@147.177,48.991 v1(153.1,48.991) v1@153.334,48.991 ; v1@153.441,53.941 U13.13@157.85,53.941 164.559,53.941 v1(166.25,52.25)
  Bottom Layer w0.3: v1@153.225,49.116 v1(153.225,53.9) ; DC8.B13@165.05,7.125 166.25,8.325 v1(166.25,52.25)
V: R23.2 R292.1 T5.1 U31.5 | length 230.6
  Top Layer w0.3: U31.5@80.398,141.037 81.911,142.55 v1(86.925,142.55) ; v1(87.65,137.65) 87.65,137.3 87.644,137.294 T5.1@87.644,137.659 89.65,137.659 91.498,139.507 v1(94.174,139.507) ; v1(88.575,117.55) v1@104.325,117.55 ; v1(104.325,125.85) v1(153.725,125.85) ; v1(153.725,128.925) v1(175.05,128.925) ; R292.1@171.507,42.186 171.646,42.325 v1(173.325,42.325)
  Bottom Layer w0.3: v1(86.925,142.55) 86.475,142.1 86.475,138.963 87.65,137.788 v1(87.65,137.65) 87.65,136.125 86.275,134.75 86.275,119.85 v1(88.575,117.55) ; v1@104.275,117.575 v1(104.325,117.625) v1(104.325,125.85) ; v1(153.725,125.85) v1(153.725,128.925) ; v1(173.325,42.325) 173.325,52.65 171.925,54.05 171.925,65.375 175.025,68.475 175.025,128.9 v1(175.05,128.925)
pads on no net: DC7.A DC7.A5 DC7.A7 DC7.A8 DC7.A9 DC7.A10 DC7.A11 DC7.A12 DC7.A17 DC7.A18 DC7.A19 DC7.A20 DC7.A21 DC7.A22 DC7.A23 DC7.A24 DC7.A30 DC7.B DC7.B6 DC7.B7 DC7.B8 DC7.B9 DC7.B10 DC7.B11 DC7.B12 DC7.B17 DC7.B18 DC7.B19 DC7.B20 DC7.B21 DC7.B22 DC7.B23 DC7.B24 DC7.B30 DC7.C5 DC7.C6 DC7.C7 DC7.C8 DC7.C9 DC7.C10 DC7.C11 DC7.C12 DC7.C17 DC7.C18 DC7.C19 DC7.C20 DC7.C21 DC7.C22 DC7.C23 DC7.C24 DC7.C30 DC8.A DC8.A5 DC8.A6 DC8.A7 DC8.A8 DC8.A9 DC8.A10 DC8.A11 DC8.A18 DC8.A19 DC8.A20 DC8.A21 DC8.A22 DC8.A23 DC8.A24 DC8.A25 DC8.A26 DC8.A27 DC8.A28 DC8.A29 DC8.B DC8.B5 DC8.B6 DC8.B7 DC8.B8 DC8.B9 DC8.B10 DC8.B18 DC8.B19 DC8.B20 DC8.B21 DC8.B22 DC8.B23 DC8.B24 DC8.B25 DC8.B26 DC8.B27 DC8.B28 DC8.B29 DC8.C5 DC8.C6 DC8.C7 DC8.C8 DC8.C9 DC8.C10 DC8.C17 DC8.C18 DC8.C19 DC8.C20 DC8.C21 DC8.C22 DC8.C23 DC8.C24 DC8.C25 DC8.C26 DC8.C27 DC8.C28 DC8.C29 R14.4 R14.5 R30.4 R30.5 R62.1 R89.1 U10.4 U11.4 U11.8 U11.9 U11.10 U11.12 U11.13 U11.14 U12.4 U12.12 U12.13 U12.14 U13.1 U13.2 U13.3 U13.4 U13.8 U13.9 U13.10 U14.4 U15.4 U15.8 U15.9 U15.10 U15.12 U15.13 U15.14 U16.4 U17.1 U17.3 U17.5 U17.7 U18.4 U19.4 U20.4 U21.4 U22.4 U23.4 U24.4 U25.4 U26.4 U27.2 U27.3 U27.6 U27.8 U27.11 U28.4 U29.4 U31.2 U31.3 U31.6 U31.8 U31.11 U32.4 U33.2 U33.3 U33.6 U33.8 U33.11 U34.4 U35.4 U36.4 U37.4 U38.4 U39.4 U41.2 U41.3 U41.6 U41.8 U41.11 U42.2 U42.3 U42.6 U42.8 U42.11 U43.4 U43.12 U43.13 U43.14 U45.2 U45.3 U45.6 U45.8 U45.11 U46.4 U47.4 U48.4 U49.4 U50.4 U51.4 U53.2 U53.3 U53.6 U53.8 U53.11 U54.4 U55.4 U56.4 U57.4 U58.4 U144.2 U144.3 U144.6 U144.8 U144.11
copper on no net:
  other v1: 115.149,118.707

## Polygon pours and split planes (outlines as drawn)
30 on Top Layer "Top Layer-No Net" (solid, remove dead copper, pour order 0): 1.294,-0.56 1.294,26.44 7.294,26.44 7.294,156.44 225.294,156.44 225.294,26.44 231.294,26.44 231.294,-0.56
30 on Bottom Layer "Top Layer-No Net1" (solid, remove dead copper, pour order 1): 1.294,-0.56 1.294,26.44 7.294,26.44 7.294,156.44 225.294,156.44 225.294,26.44 231.294,26.44 231.294,-0.56

## Keep-outs
Keep-Out Layer:
  lines w0.1: 1.294,-0.56 231.294,-0.56 ; 9.307,-0.406 9.307,149.494 223.132,149.494 223.132,0.925
  lines w0.2: 1.294,-0.56 1.294,26.44 7.294,26.44 7.294,156.44 225.294,156.44 225.294,26.44 231.294,26.44 231.294,-0.56

## Other copper
Top Layer:
  rectangle net 30: 223.2,26.5 225.294,149.55
  rectangle net 30: 7.294,26.525 9.25,149.5
  rectangle net 30: 7.294,149.5 225.3,156.44
  rectangle net 30: 223.2,-0.5 231.294,26.44
  rectangle net 30: 1.294,-0.5 9.25,26.44
  rectangle net "CONTACT R": 86.55,3.625 88.5,10.65
  rectangle net "CONTACT X": 89,3.725 91.025,10.65
  rectangle net "COMP[NX UOP": 84.175,3.7 86.1,10.7
  rectangle net INT.B: 81.625,3.7 83.55,10.7
  rectangle net INT.A: 79.2,3.65 80.975,10.65
  rectangle net "B PR": 56.625,3.65 58.525,10.725
  rectangle net "A PR": 54.15,3.7 55.95,10.775
  rectangle net "OC\"B\"": 51.65,3.675 53.475,10.875
  rectangle net "OC\"A\"": 49.2,3.775 50.925,10.8
  rectangle net +6,3V: 26.55,3.725 28.5,10.75
  rectangle net +3,5V: 24.125,3.7 25.975,10.85
  rectangle net +5V: 21.475,3.75 23.425,10.85
  rectangle net +12,6V: 141.475,3.55 143.5,10.575
  rectangle net -12,6V: 139,3.525 140.925,10.6
  rectangle net -20V: 136.6,3.525 138.475,10.625
  region: 104.676,30.668
Bottom Layer:
  rectangle net 30: 223.2,26.5 225.294,149.55
  rectangle net 30: 7.294,26.525 9.25,149.5
  rectangle net 30: 7.294,149.5 225.3,156.44
  rectangle net 30: 223.2,-0.5 231.294,26.44
  rectangle net 30: 1.294,-0.5 9.25,26.44
  rectangle net +12,6V: 141.5,3.525 143.525,10.55
  rectangle net -12,6V: 139,3.525 140.925,10.6
  rectangle net -20V: 136.6,3.525 138.475,10.625
  rectangle net INT.A: 79.175,3.675 80.975,10.65
  rectangle net INT.B: 81.625,3.725 83.55,10.725
  rectangle net "COMP[NX UOP": 84.175,3.7 86.1,10.7
  rectangle net "CONTACT R": 86.55,3.625 88.475,10.675
  rectangle net "CONTACT X": 88.975,3.725 91.025,10.675
  rectangle net "OC\"A\"": 49.175,3.775 50.925,10.8
  rectangle net "OC\"B\"": 51.65,3.675 53.475,10.875
  rectangle net "A PR": 54.15,3.7 55.95,10.775
  rectangle net "B PR": 56.625,3.65 58.525,10.725
  rectangle net +5V: 21.475,3.75 23.425,10.85
  rectangle net +3,5V: 24.125,3.7 25.975,10.85
  rectangle net +6,3V: 26.55,3.725 28.5,10.75
  region: 104.676,30.668

## Silkscreen, mask and mechanical layers (free items; w line width, h text height)
Top Overlay:
  lines w0.2: 27.1,128.75 27.55,129.2 ; 27.55,127.475 27.55,129.2 ; 28,128.75 27.55,129.2 ; 195.925,130.05 196.375,130.5 ; 196.375,128.775 196.375,130.5 ; 196.825,130.05 196.375,130.5 ; 36.55,13 38.075,13 38.075,14.475 36.55,14.475 36.55,13 ; 49.275,13.5 50.8,13.5 50.8,14.85 49.275,14.85 49.275,13.5 ; 51.775,13.45 53.3,13.45 53.3,14.825 51.775,14.825 51.775,13.45 ; 54.275,13.4 55.8,13.4 55.8,14.775 54.275,14.775 54.275,13.4 ; 57.275,13.425 58.8,13.425 58.8,14.85 57.275,14.85 57.275,13.425 ; 59.725,102.65 61.25,102.65 61.25,104.125 59.725,104.125 59.725,102.65 ; 75.75,29.943 77.275,29.943 77.275,31.418 75.75,31.418 75.75,29.943 ; 75.75,32.2 77.275,32.2 77.275,33.675 75.75,33.675 75.75,32.2 ; 77.4,23.825 77.4,25.3 78.925,25.3 78.925,23.825 77.4,23.825 ; 78.425,22 78.425,23.475 79.95,23.475 79.95,22 78.425,22 ; 83.75,32.375 83.75,33.85 85.275,33.85 85.275,32.375 83.75,32.375 ; 84.875,49.326 86.4,49.326 86.4,50.801 84.875,50.801 84.875,49.326 ; 85.75,31.225 85.75,32.7 87.275,32.7 87.275,31.225 85.75,31.225 ; 86.8,54.35 88.325,54.35 88.325,55.825 86.8,55.825 86.8,54.35 ; 103.525,32.875 105.05,32.875 105.05,34.35 103.525,34.35 103.525,32.875 ; 107.025,32.675 108.55,32.675 108.55,34.15 107.025,34.15 107.025,32.675 ; 144.05,32.425 145.575,32.425 145.575,33.9 144.05,33.9 144.05,32.425 ; 173,58.525 174.525,58.525 174.525,60 173,60 173,58.525 ; 179.55,60.925 181.075,60.925 181.075,62.4 179.55,62.4 179.55,60.925
  lines w0.254: 217.775,127.975 221.55,127.975 221.55,146.2 217.775,146.2 217.775,127.975
  lines w0.5: 97.9,143.575 ccw(c97.984,143.521) 97.914,143.592
  text "A313_V.04" at 220.625,128.9 h2 r90
  text "Tang_tro" at 192.025,127.35 h0.8
  text "Tang_tro" at 23.2,126.05 h0.8
  text "INT_A" at 61.85,103.125 h0.8
  text "F_" at 179.95,63.075 h0.8
  text "F" at 173.425,60.975 h0.8
  text "PP" at 84.325,55.05 h0.8
  text "PP_" at 85.325,47.925 h0.8
  text "D_" at 104.3,34.85 h0.8 r30
  text "D" at 107.775,34.5 h0.8 r30
  text "KN2_" at 83.575,34.45 h0.8
  text "INT_B" at 139.7,32.875 h0.8
  text "KN1" at 78.025,32.7 h0.8
  text "KN1_" at 78.025,30.425 h0.8
  text "KN2" at 84.4,29.95 h0.8
  text "INT_A" at 79.725,24.175 h0.8
  text "INT_B" at 80.625,22.275 h0.8
  text "OC_A" at 50.05,15.45 h0.8 r30
  text "OC_B" at 52.6,15.15 h0.8 r30
  text "B_PR" at 58.1,15.15 h0.8 r30
  text "A_PR" at 55.075,15.025 h0.8 r30
  text "compar" at 35.4,11.925 h0.8
Mechanical 1:
  drawing of 190 lines, arcs and shapes, not listed

## Text inside footprints (layer, text, board x,y; h text height)
C6: Mechanical 8 "1" at 82.891,98.114 h0.8 r180; Mechanical 8 "2" at 77.491,98.114 h0.8 r180
C7: Mechanical 8 "2" at 76.516,62.939 h0.8 r180; Mechanical 8 "1" at 81.916,62.939 h0.8 r180
C9: Mechanical 8 "2" at 199.374,137.853 h0.8 r180; Mechanical 8 "1" at 204.774,137.853 h0.8 r180
C10: Mechanical 8 "2" at 169.709,21.661 h0.8; Mechanical 8 "1" at 164.309,21.661 h0.8
C27: Mechanical 8 "2" at 193.366,43.514 h0.8 r180; Mechanical 8 "1" at 198.766,43.514 h0.8 r180
C31: Mechanical 8 "2" at 195.761,81.825 h0.8 r180; Mechanical 8 "1" at 201.161,81.825 h0.8 r180
DC7: Top Overlay "32" at 96.742,11.975 h1; Top Overlay "C" at 10.275,9.102 h1; Top Overlay "B" at 10.275,6.602 h1; Top Overlay "A" at 10.275,4.102 h1; Top Overlay "1" at 19.908,11.975 h1; Bottom Overlay "32" at 98.4,12 h1; Bottom Overlay "1" at 20.475,11.775 h1 r1.82; Bottom Overlay "C" at 10.966,9.104 h1 r0.1; Bottom Overlay "B" at 10.966,6.603 h1 r0.05; Bottom Overlay "A" at 10.947,4.106 h1 r359.11
DC8: Top Overlay "1" at 134.908,11.95 h1; Top Overlay "A" at 123.875,4.077 h1; Top Overlay "B" at 123.875,6.577 h1; Top Overlay "C" at 123.875,9.077 h1; Top Overlay "32" at 211.742,11.95 h1; Bottom Overlay "A" at 124.522,4.081 h1 r359.11; Bottom Overlay "B" at 124.541,6.578 h1 r0.05; Bottom Overlay "C" at 124.541,9.079 h1 r0.1; Bottom Overlay "1" at 135.475,11.75 h1 r1.82; Bottom Overlay "32" at 213.4,11.975 h1
R14: Mechanical 6 "4" at 25.645,139.688 h0.8 r180; Mechanical 6 "5" at 16.245,130.288 h0.8 r180
R30: Mechanical 6 "5" at 184.995,131.438 h0.8 r180; Mechanical 6 "4" at 194.395,140.838 h0.8 r180